# Altium PCB RheoBoard_v2.PcbDoc (part 1 of 5)
Units mm, origin at the board's own origin, x right, y up, seen from the top; angles counter-clockwise.
Board outline 136.04 x 88.34 mm, 2 copper layers (Top Layer, Bottom Layer); 133 components, 71 nets, 341 pads, 184 vias.
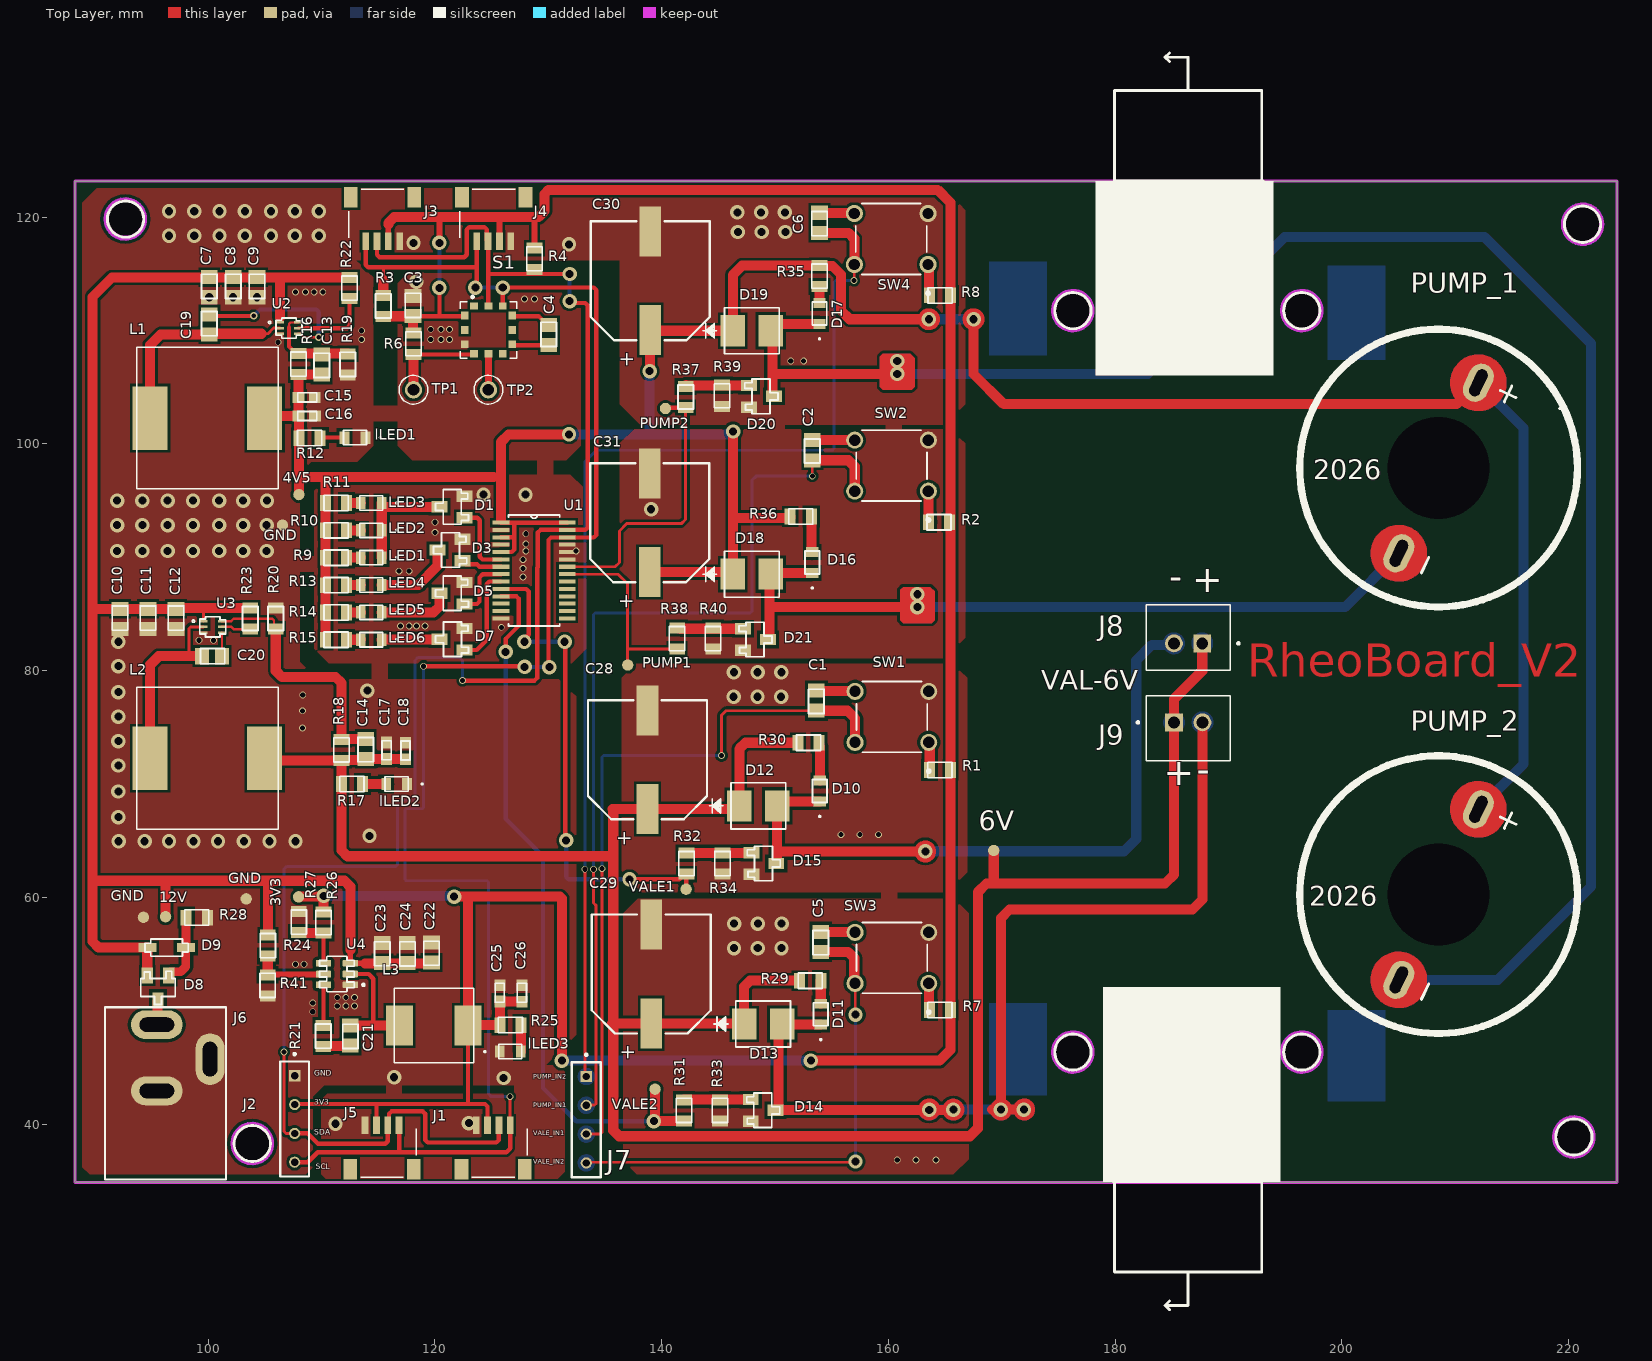
[diagram p0: Top Layer view]
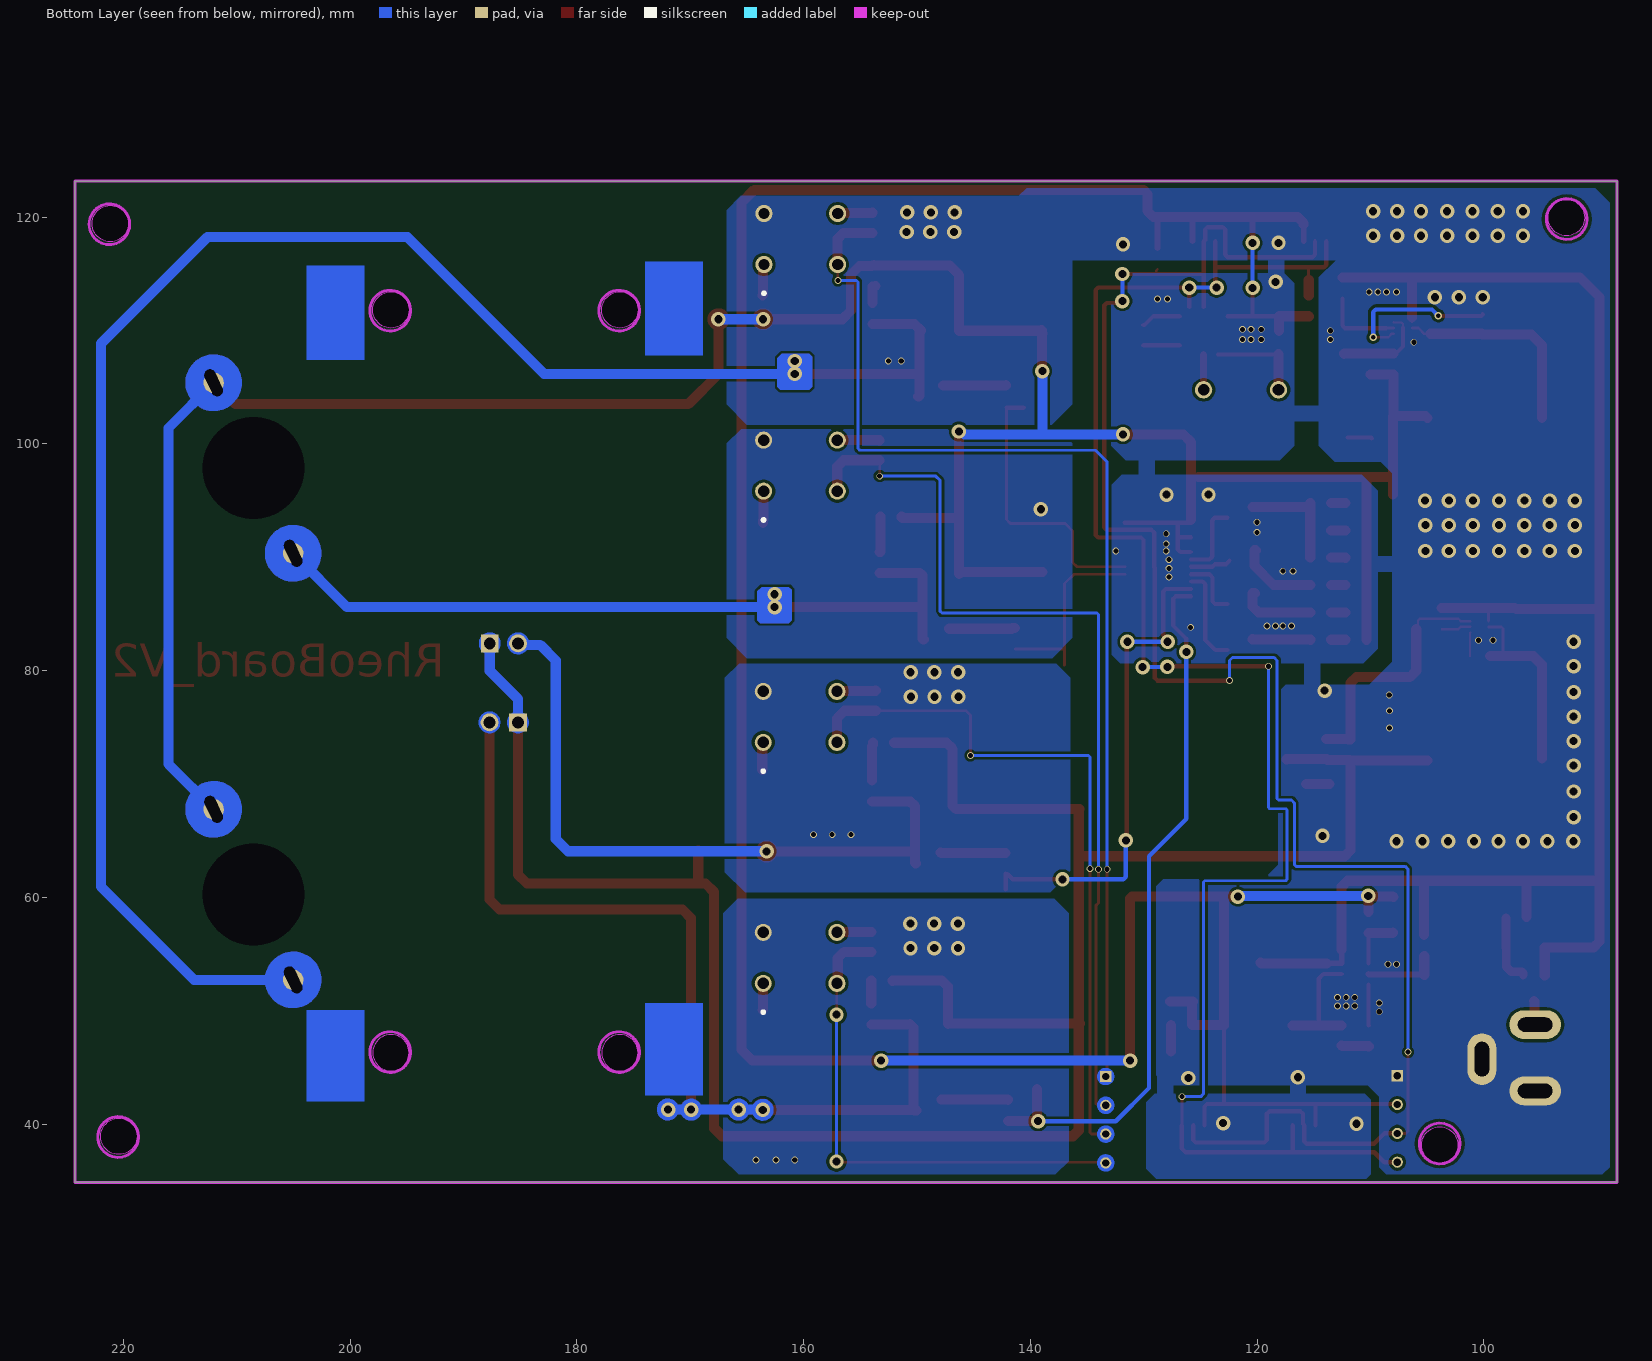
[diagram p1: Bottom Layer view, seen from below]
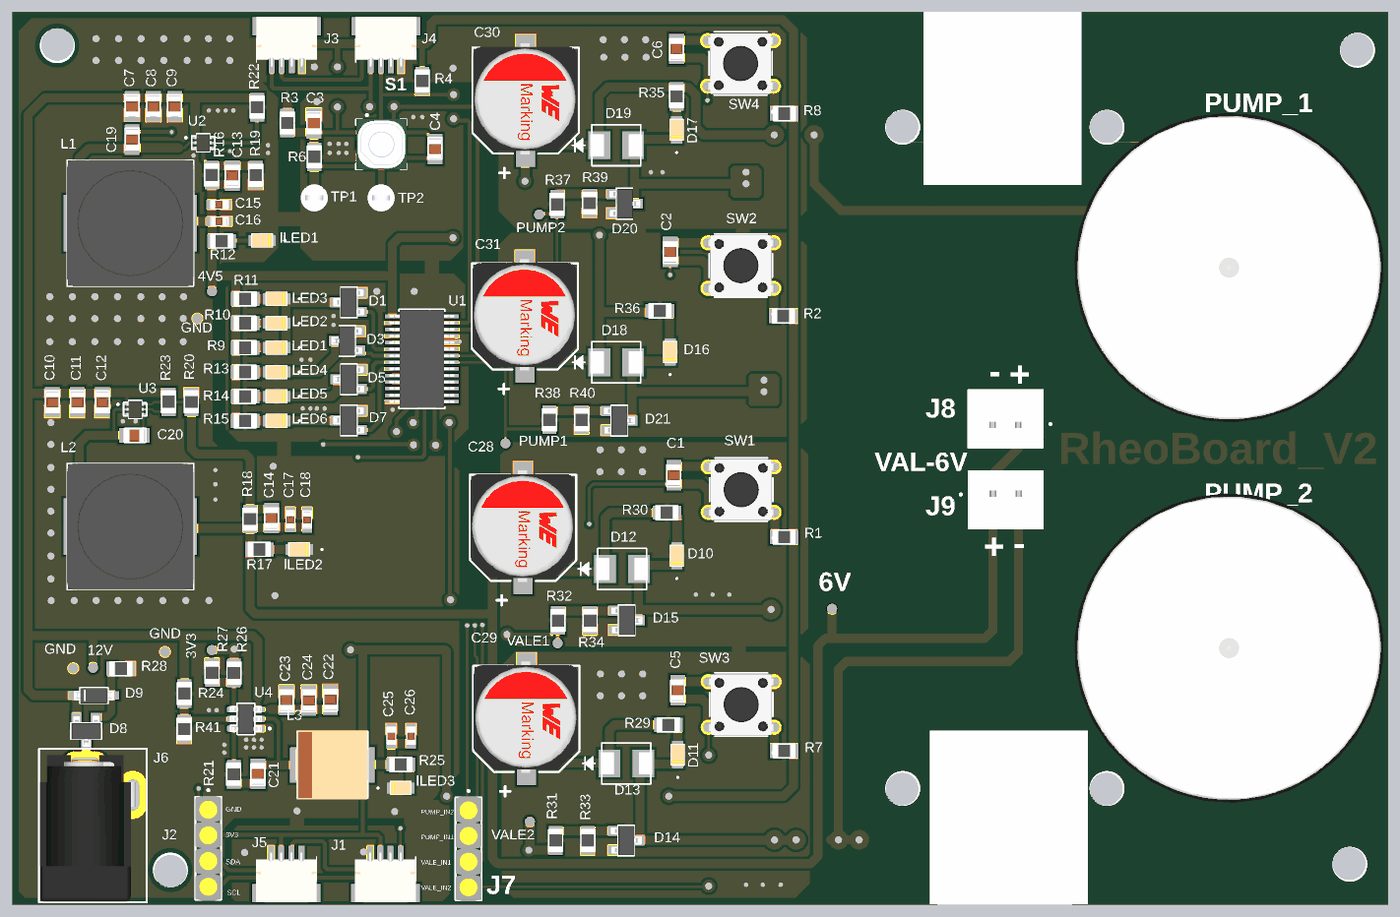
[diagram p3: 3D render of the assembled board from above, using the file's embedded part models]

## Layer stack, top to bottom
Top Solder: solder mask 0.0102, Solder Resist, Dk 3.5
Top Layer: signal copper 0.0356
Dielectric 1: dielectric 0.32, FR-4, Dk 4.8
Bottom Layer: signal copper 0.0356
Bottom Solder: solder mask 0.0102, Solder Resist, Dk 3.5

## Board outline
88.24,34.85 88.24,123.19 106.965,123.19 224.282,123.19 224.282,34.85
cut-out: 218.803,38.92 ccw(c220.403,38.92) 220.403,37.32 ccw(c220.403,38.92) 222.003,38.92 ccw(c220.403,38.92) 220.403,40.52 ccw(c220.403,38.92)
cut-out: 218.803,38.92 ccw(c220.403,38.92) 220.403,37.32 ccw(c220.403,38.92) 222.003,38.92 ccw(c220.403,38.92) 220.403,40.52 ccw(c220.403,38.92)
cut-out: 174.607,46.297 cw(c176.207,46.297) 176.207,47.897 cw(c176.207,46.297) 177.807,46.297 cw(c176.207,46.297) 176.207,44.697 cw(c176.207,46.297)
cut-out: 174.607,46.297 cw(c176.207,46.297) 176.207,47.897 cw(c176.207,46.297) 177.807,46.297 cw(c176.207,46.297) 176.207,44.697 cw(c176.207,46.297)
cut-out: 194.8,46.297 cw(c196.4,46.297) 196.4,47.897 cw(c196.4,46.297) 198,46.297 cw(c196.4,46.297) 196.4,44.697 cw(c196.4,46.297)
cut-out: 194.8,46.297 cw(c196.4,46.297) 196.4,47.897 cw(c196.4,46.297) 198,46.297 cw(c196.4,46.297) 196.4,44.697 cw(c196.4,46.297)
cut-out: 174.607,111.818 ccw(c176.207,111.818) 176.207,110.218 ccw(c176.207,111.818) 177.807,111.818 ccw(c176.207,111.818) 176.207,113.418 ccw(c176.207,111.818)
cut-out: 174.607,111.818 ccw(c176.207,111.818) 176.207,110.218 ccw(c176.207,111.818) 177.807,111.818 ccw(c176.207,111.818) 176.207,113.418 ccw(c176.207,111.818)
cut-out: 194.8,111.818 ccw(c196.4,111.818) 196.4,110.218 ccw(c196.4,111.818) 198,111.818 ccw(c196.4,111.818) 196.4,113.418 ccw(c196.4,111.818)
cut-out: 194.8,111.818 ccw(c196.4,111.818) 196.4,110.218 ccw(c196.4,111.818) 198,111.818 ccw(c196.4,111.818) 196.4,113.418 ccw(c196.4,111.818)
cut-out: 219.565,119.438 ccw(c221.165,119.438) 221.165,117.838 ccw(c221.165,119.438) 222.765,119.438 ccw(c221.165,119.438) 221.165,121.038 ccw(c221.165,119.438)
cut-out: 219.565,119.438 ccw(c221.165,119.438) 221.165,117.838 ccw(c221.165,119.438) 222.765,119.438 ccw(c221.165,119.438) 221.165,121.038 ccw(c221.165,119.438)
cut-out: 91.11,119.957 ccw(c92.71,119.957) 92.71,118.357 ccw(c92.71,119.957) 94.31,119.957 ccw(c92.71,119.957) 92.71,121.557 ccw(c92.71,119.957)
cut-out: 102.286,38.158 ccw(c103.886,38.158) 103.886,36.558 ccw(c103.886,38.158) 105.486,38.158 ccw(c103.886,38.158) 103.886,39.758 ccw(c103.886,38.158)

## Design rules (kind name [scope] priority, off if disabled: settings)
Clearance [All] p1: gap=0.254 ignorepadtopadclearanceinfootprint=FALSE except(0: Arc-Hole Track-Hole SMDPad-Hole THPad-Hole Via-Hole Fill-Hole Poly-Hole Region-Hole Text-Hole)
PolygonConnect [All] p1: connectstyle=Direct reliefconductorwidth=0.254 reliefentries=4 polygonreliefangle="90 Angle" airgapwidth=0.254
RoutingVias [All] p1: holewidth=0.45 width=0.55 viastyle="Through Hole" minholewidth=0.381 minwidth=0.381 maxholewidth=1.27 maxwidth=1.27
SolderMaskExpansion [All] p1: expansion=0.102 istentingtop=FALSE
Width [All] p1: maxlimit=0.889 minlimit=0.203 preferedwidth=0.381 minimp=50.000000 maximp=50.000000 favimp=50.000000
30 further rules are at their usual default settings.

## Classes and differential pairs
component class POWER: 3V3 4V5 6V 12V C7 C8 C9 C10 C11 C12 C13 C14 C15 C16 C17 C18 C19 C20 C21 C22 C23 C24 C25 C26 D8 D9 GND J6 L1 L2 L3 lLED1 lLED2 lLED3 R12 R16 R17 R18 R19 R20 R21 R22 R23 R24 R25 R26 R27 R28 R41 U2 U3 U4
component class MAIN: C1 C2 C3 C4 C5 C6 C28 C29 C30 C31 D1 D3 D5 D7 D10 D11 D12 D13 D14 D15 D16 D17 D18 D19 D20 D21 J1 J2 J3 J4 J5 J7 J8 J9 LED1 LED2 LED3 LED4 LED5 LED6 PUMP1 PUMP2 PUMP_1 PUMP_2 R1 R2 R3 R4 R6 R7 R8 R9 R10 R11 R13 R14 R15 R29 R30 R31 R32 R33 R34 R35 R36 R37 R38 R39 R40 S1 SW1 SW2 SW3 SW4 TP1 TP2 U1 VALE1 VALE2

## Components (designator, comment, footprint, x,y, rotation, side; value= is the part's Value field where it differs from the comment)
3V3 "TP_1MM" TP_1mm 107.975,60.046 r90 top
4V5 "TP_1MM" TP_1mm 108.001,95.529 r90 top
6V "6V" TP_1mm 169.291,64.135 r0 top
12V "TP_1MM" TP_1mm 96.241,58.293 r90 top
C1 "0.1UF,50V" CAP_CER_0805 153.64,77.35 r270 top
C2 "0.1UF,50V" CAP_CER_0805 153.289,99.441 r270 top
C3 "0.1UF,50V" CAP_CER_0805 118.06,112.15 r90 top
C4 "1nF 50V" CAP_CER_0805 130.048,109.601 r90 top
C5 "0.1UF,50V" CAP_CER_0805 154.035,56.07 r270 top
C6 "0.1UF,50V" CAP_CER_0805 153.924,119.507 r270 top
C7 "10UF 50V" CAP_CER_0805 100.09,113.824 r90 top
C8 "10UF 50V" CAP_CER_0805 102.2,113.824 r90 top
C9 "0.1UF,50V" CAP_CER_0805 104.31,113.824 r90 top
C10 "10UF 50V" CAP_CER_0805 92.212,84.564 r90 top
C11 "10UF 50V" CAP_CER_0805 94.688,84.564 r90 top
C12 "0.1UF,50V" CAP_CER_0805 97.165,84.564 r90 top
C13 "18pF 50V" CAP_CER_0805 110.01,106.99 r270 top
C14 "18pF 50V" CAP_CER_0805 113.896,73.1 r270 top
C15 "22uF 6.3V" CAP_CER_0603 108.68,104.11 r180 top
C16 "22uF 6.3V" CAP_CER_0603 108.69,102.46 r180 top
C17 "22uF 6.3V" CAP_CER_0603 115.74,72.93 r270 top
C18 "22uF 6.3V" CAP_CER_0603 117.4,72.91 r270 top
C19 "0.1UF,50V" CAP_CER_0805 100.1,110.54 r90 top
C20 "0.1UF,50V" CAP_CER_0805 100.33,81.28 r0 top
C21 "0.1UF,50V" CAP_CER_0805 112.54,47.8 r270 top
C22 "0.1UF,50V" CAP_CER_0805 119.699,55.136 r270 top
C23 "10UF 25V" CAP_CER_0805 115.36,55.095 r270 top
C24 "10UF 25V" CAP_CER_0805 117.569,55.076 r270 top
C25 "22uF 6.3V" CAP_CER_0603 125.72,51.53 r270 top
C26 "22uF 6.3V" CAP_CER_0603 127.671,51.525 r270 top
C28 "100uF 25V" CAP_ALUM_SMD_D10_H12.4 138.75,72.14 r270 top
C29 "100uF 25V" CAP_ALUM_SMD_D10_H12.4 139.08,53.24 r270 top
C30 "100uF 25V" CAP_ALUM_SMD_D10_H12.4 139,114.395 r270 top
C31 "100uF 25V" CAP_ALUM_SMD_D10_H12.4 138.94,93.04 r270 top
D1 "30V 5.8A" SOT-23-3 121.505,94.445 r90 top
D3 "30V 5.8A" SOT-23-3 121.335,90.635 r90 top
D5 "30V 5.8A" SOT-23-3 121.505,86.825 r90 top
D7 "30V 5.8A" SOT-23-3 121.51,82.77 r90 top
D8 "20V 4A" SOT-23-3 95.57,52.02 r180 top
D9 "BZT52C5V1" SOD-123 96.33,55.56 r0 top
D10 "Led green" "LED_LS R976_AOS" 153.94,69.38 r90 top
D11 "Led green" "LED_LS R976_AOS" 154.03,49.7 r90 top
D12 "3A 40V" DO214AA 148.53,68.07 r0 top
D13 "3A 40V" DO214AA 148.955,48.835 r0 top
D14 "30V 5.8A" SOT-23-3 148.955,41.215 r270 top
D15 "30V 5.8A" SOT-23-3 149.01,62.99 r270 top
D16 "Led green" "LED_LS R976_AOS" 153.289,89.535 r90 top
D17 "Led green" "LED_LS R976_AOS" 153.924,111.506 r90 top
D18 "3A 40V" DO214AA 147.954,88.508 r0 top
D19 "3A 40V" DO214AA 147.954,109.982 r0 top
D20 "30V 5.8A" SOT-23-3 148.798,104.196 r270 top
D21 "30V 5.8A" SOT-23-3 148.273,82.748 r270 top
GND "TP_1MM" TP_1mm 103.353,59.868 r90 top
GND "TP_1MM" TP_1mm 94.285,58.242 r90 top
GND "TP_1MM" TP_1mm 106.553,92.837 r90 top
J1 "14417" SPARKFUN_PRT-14417 125.14,37.453 r0 top
J2 "TS-104-T-A" HDR_THT_1X04_P2.54 107.63,40.45 r270 top
J3 "14417" SPARKFUN_PRT-14417 115.39,120.33 r180 top
J4 "14417" SPARKFUN_PRT-14417 125.19,120.33 r180 top
J5 "14417" SPARKFUN_PRT-14417 115.34,37.453 r0 top
J6 "694106301002" "CONN PWR JACK 2.1X5.5MM SOLDER" 95.72,42.93 r90 top
J7 "TS-104-T-A" HDR_THT_1x04_P2.54 133.35,40.386 r270 top
J8 "VERT" CONN_SMD_TOP_P2.50 186.436,82.931 r0 top
J9 "VERT" CONN_SMD_TOP_P2.50 186.456,74.913 r180 top
L1 "2.2uH" IND_12.5x12.5_H8.5 99.93,102.28 r180 top
L2 "2.2uH" IND_12.5x12.5_H8.5 99.93,72.263 r180 top
L3 "4.7uH" IND_6.8X6.5_H2.8 123.42,52 r180 top
LED1 "RED 2V 20mA" "LED_LS R976_AOS" 114.381,89.965 r180 top
LED2 "RED 2V 20mA" "LED_LS R976_AOS" 114.381,92.378 r180 top
LED3 "RED 2V 20mA" "LED_LS R976_AOS" 114.381,94.791 r180 top
LED4 "Led green" "LED_LS R976_AOS" 114.381,87.552 r180 top
LED5 "Led green" "LED_LS R976_AOS" 114.381,85.139 r180 top
LED6 "Led green" "LED_LS R976_AOS" 114.381,82.726 r180 top
lLED1 "RED 2V 20mA" "LED_LS R976_AOS" 112.95,100.56 r180 top
lLED2 "RED 2V 20mA" "LED_LS R976_AOS" 116.62,70 r180 top
lLED3 "RED 2V 20mA" "LED_LS R976_AOS" 126.65,46.4 r0 top
PUMP1 "TP_1MM" TP_1mm 137.008,80.493 r90 top
PUMP2 "TP_1MM" TP_1mm 140.335,103.124 r90 top
PUMP_1 "0010844022" "PUMP_LPM - ZR370-02PM"#1 208.534,97.872 r245 top
PUMP_2 "0010844022" "PUMP_LPM - ZR370-02PM"#2 208.534,60.243 r245 top
R1 "10K 1% 0805" RES_0805 164.55,71.23 r0 top
R2 "10K 1% 0805" RES_0805 164.465,93.091 r0 top
R3 "10K 1% 0805" RES_0805 115.443,112.182 r90 top
R4 "10K 1% 0805" RES_0805 128.778,116.332 r270 top
R6 "10K 1% 0805" RES_0805 118.11,108.839 r90 top
R7 "10K 1% 0805" RES_0805 164.55,50.07 r0 top
R8 "10K 1% 0805" RES_0805 164.564,113.106 r0 top
R9 "220R 0805" RES_0805 111.279,89.959 r180 top
R10 "220R 0805" RES_0805 111.279,92.372 r180 top
R11 "220R 0805" RES_0805 111.279,94.785 r180 top
R12 "1K 1% 0805" RES_0805 108.95,100.51 r180 top
R13 "220R 0805" RES_0805 111.279,87.546 r0 top
R14 "220R 0805" RES_0805 111.279,85.133 r0 top
R15 "220R 0805" RES_0805 111.279,82.72 r0 top
R16 "130K 0805" RES_0805 107.96,107.04 r270 top
R17 "1K 1% 0805" RES_0805 112.68,70 r180 top
R18 "270K 0805" RES_0805 111.754,73.01 r270 top
R19 "20K 0805" RES_0805 112.32,107.02 r270 top
R20 "30K 0805" RES_0805 105.96,84.6 r270 top
R21 "30Ohm 0805" RES_0805 110.15,47.76 r270 top
R22 "100K 0805" RES_0805 112.46,113.74 r90 top
R23 "100K 0805" RES_0805 103.71,84.6 r90 top
R24 "174K 0805" RES_0805 105.26,55.75 r90 top
R25 "470R 0805" RES_0805 126.655,48.731 r180 top
R26 "75K 0805" RES_0805 110.169,57.779 r90 top
R27 "24K 0805" RES_0805 108,57.81 r270 top
R28 "100K 0805" RES_0805 98.99,58.21 r180 top
R29 "220R 0805" RES_0805 153.105,52.645 r0 top
R30 "220R 0805" RES_0805 152.96,73.64 r0 top
R31 "100R 0805" RES_0805 141.97,41.215 r90 top
R32 "100R 0805" RES_0805 142.195,62.97 r90 top
R33 "10K 1% 0805" RES_0805 145.145,41.215 r90 top
R34 "10K 1% 0805" RES_0805 145.37,62.97 r90 top
R35 "220R 0805" RES_0805 153.924,114.808 r270 top
R36 "220R 0805" RES_0805 152.273,93.599 r0 top
R37 "100R 0805" RES_0805 142.113,104.14 r90 top
R38 "100R 0805" RES_0805 141.361,82.831 r90 top
R39 "10K 1% 0805" RES_0805 145.322,104.25 r90 top
R40 "10K 1% 0805" RES_0805 144.536,82.831 r90 top
R41 "36.5K 0805" RES_0805 105.239,52.233 r90 top
S1 "MPRLS0025PA00001A" XDCR_MPRLS0025PA00001A 124.714,110.061 r0 top
SW1 "B3F-1020" SW_B3F-1000_OMR 163.56,73.67 r180 top
SW2 "B3F-1020" SW_B3F-1000_OMR 163.531,95.832 r180 top
SW3 "B3F-1020" SW_B3F-1000_OMR 163.56,52.415 r180 top
SW4 "B3F-1020" SW_B3F-1000_OMR 163.498,115.826 r180 top
TP1 "5002" KEYSTONE_5002 118.11,104.775 r0 top
TP2 "5002" KEYSTONE_5002 124.714,104.775 r0 top
U1 "PCA9685PW,118" TSSOP-28 128.745,88.835 r0 top
U2 "TPS563203DRLR" SOT-563 107.13,110.22 r0 top
U3 "TPS563203DRLR" SOT-563 100.4,83.86 r0 top
U4 "TPS56339DDCT" SOT-23-6 111.35,53.235 r180 top
VALE1 "TP_1MM" TP_1mm 142.164,60.719 r90 top
VALE2 "TP_1MM" TP_1mm 139.421,43.078 r90 top

## Footprints (in the part's own frame and the unit in brackets; to place one, negate y for a bottom-side part, rotate by r counter-clockwise, add the part's x,y. Pads: shape width x height; smd on the part's side, far side on the other; paste and mask are expansions set on the pad)
CAP_ALUM_SMD_D10_H12.4 [mm]
  rect 4.4x1.9 smd: 1(4.35,0) 2(-4.35,0)
  silkscreen extent -5.25,-5.25 5.25,5.25, body extent -5.67,-5.21 5.33,5.09, height 12.25
CAP_CER_0603 [mm]
  rect 1.04x0.97 smd paste+0 mask+0.102: 1(-0.726,0) 2(0.726,0)
  silkscreen extent -0.89,-0.4 0.79,0.4, body extent -0.8,-0.4 0.8,0.4, height 0.95
CAP_CER_0805 [mm]
  rect 1.24x1.47 smd: 1(-0.885,0) 2(0.885,0)
  silkscreen extent -1,-0.68 1.13,0.68, body extent -1,-0.62 1,0.63, height 1.45
"CONN PWR JACK 2.1X5.5MM SOLDER" [mil]
  oval 100x180 hole 50 slot 120 at 90 deg: 1(230,10) 2(0,10)
  oval 180x100 hole 50 slot 120 at 0 deg: 3(110,-175)
  silkscreen extent -308,-230 290,190, body extent -306,-187 265,187, height 421
CONN_SMD_TOP_P2.50 [mm]
  rect 1.575x1.575 / inner round 1.575 / far side rect 1.575x1.575 hole 1.05: 1(1.25,-0.525)
  round 1.575 hole 1.05: 2(-1.25,-0.525)
  silkscreen extent -3.7,-2.88 4.54,2.88, body extent -3.75,-2.79 3.75,2.91, height 2.11
DO214AA [mil]
  rect 85x108 smd paste+0 mask+0: 1(-66,0) 2(66,0)
  silkscreen extent -170,-80 95,80, body extent -108,-78 108,78, height 96
HDR_THT_1X04_P2.54 [mm]
  rect 0.985x0.985 hole 0.635: 01(-3.81,0)
  round 0.985 hole 0.635: 02(-1.27,0) 03(1.27,0) 04(3.81,0)
  silkscreen extent -5.83,-1.27 5.08,1.27, body extent -5.18,-1.27 5.18,1.27, height 8.28
HDR_THT_1x04_P2.54 [mm]
  rect 0.985x0.985 hole 0.635: 01(-3.81,0)
  round 0.985 hole 0.635: 02(-1.27,0) 03(1.27,0) 04(3.81,0)
  silkscreen extent -5.83,-1.27 5.08,1.27, body extent -5.18,-1.27 5.18,1.27, height 8.28
IND_6.8X6.5_H2.8 [mm]
  rect 2.35x3.5 smd: 1(6.55,3.3) 2(0.5,3.3)
  silkscreen extent 0,0 7,6.6, body extent -0.09,-0.1 7.2,6.71, height 3.05
IND_12.5x12.5_H8.5 [mm]
  rect 3.1x5.6 smd: 1(-5.05,0) 2(5.05,0)
  silkscreen extent -6.25,-6.25 6.25,6.25, body extent -6.25,-6.25 6.25,6.25, height 6.5
KEYSTONE_5002 [mm]
  round 1.53 hole 1.02: TP(0,0)
  silkscreen extent -1.27,-1.27 1.27,1.27, body extent -1.27,-1.27 1.27,1.27, height 4.57
"LED_LS R976_AOS" [mil]
  rect 33.78x43 smd paste+0 mask+0: 1(-36.39,0) 2(36.39,0)
  silkscreen extent -91,-25 40,25, body extent -39,-26 39,26, height 32
"PUMP_LPM - ZR370-02PM"#1 [mm]
  oval 3.5x2.2 / inner round 1.524 / far side round 1.808 hole 1 slot 2.5 at 0 deg paste-2539.97 mask+0: 1(-8.3,0) 2(8.3,0)
  round 1.524 hole 9 unplated: S(0,0)
  silkscreen extent -12.25,-12.25 12.25,12.25, body extent -15.31,-15.31 15.31,15.31, height 65
"PUMP_LPM - ZR370-02PM"#2 [mm]
  oval 3.5x2.2 / inner round 1.524 / far side round 1.808 hole 1 slot 2.5 at 0 deg paste-2539.97 mask+0: 1(-8.3,0) 2(8.3,0)
  round 1.524 hole 9 unplated: 3(0,0)
  silkscreen extent -12.25,-12.25 12.25,12.25, body extent -15.31,-15.31 15.31,15.31, height 65
RES_0805 [mm]
  rect 0.97x1.38 smd: 1(-0.93,0) 2(0.93,0)
  silkscreen extent -1.07,-0.69 1.07,0.68, body extent -1,-0.62 1,0.63, height 0.6
SOD-123 [mm]
  rect 1.6x0.8 smd: 1(-1.7,0) 2(1.7,0)
  silkscreen extent -1.91,-0.76 1.91,0.76, body extent -1.82,-0.77 1.83,0.78, height 1.44
SOT-23-3 [mm]
  rect 1x1.4 smd paste+0 mask+0.102: 1(-0.95,-1.1) 2(0.95,-1.1) 3(0,1.1)
  silkscreen extent -1.52,-1.46 1.52,1.46, body extent -1.45,-1.4 1.45,1.4, height 1.25
SOT-23-6 [mm]
  rrect25% 1.35x0.6 smd: 1(-1.185,0.95) 2(-1.185,0) 3(-1.185,-0.95) 4(1.185,-0.95) 5(1.185,0) 6(1.185,0.95)
  silkscreen extent -2.45,-1.55 1.52,1.55, body extent -1.4,-1.5 1.4,1.5, height 1.16
SOT-563 [mil]
  rect 28x9 smd paste+0 mask+0: 1(-31.5,19.69) 2(-31.5,0) 3(-31.5,-19.69) 4(31.5,-19.69) 5(31.5,0) 6(31.5,19.69)
  silkscreen extent -71,-35 45,35, body extent -34,-34 34,34, height 24
SPARKFUN_PRT-14417 [mm]
  rect 0.6x1.55 smd: 1(-1.5,2.45) 2(-0.5,2.45) 3(0.5,2.45) 4(1.5,2.45)
  rect 1.2x1.8 smd: S1(-2.8,-1.425) S2(2.8,-1.425)
  silkscreen extent -1.88,-2.12 3,2.12, body extent -3,-2.37 3,2.58, height 2.95
SW_B3F-1000_OMR [mm]
  round 1.508 / inner round 1.524 / far side round 1.508 hole 1 paste-2539.97 mask+0: 1(0,0) 2(6.5,0) 3(0,-4.5) 4(6.5,-4.5)
  silkscreen extent -0.13,-5.38 6.38,2.67, body extent -0.7,-5.24 7.2,0.76, height 5
TP_1mm [mm]
  round 1 smd: 1(0,0)
TSSOP-28 [mil]
  rect 58x14 smd: 1(-115,166) 2(-115,141) 3(-115,115) 4(-115,90) 5(-115,64) 6(-115,38) 7(-115,13) 8(-115,-13) 9(-115,-38) 10(-115,-64) 11(-115,-90) 12(-115,-115) 13(-115,-141) 14(-115,-166) 15(115,-166) 16(115,-141) 17(115,-115) 18(115,-90) 19(115,-64) 20(115,-38) 21(115,-13) 22(115,13) 23(115,38) 24(115,64) 25(115,90) 26(115,115) 27(115,141) 28(115,166)
  silkscreen extent -89,-193 89,193, body extent -126,-191 126,191, height 43
XDCR_MPRLS0025PA00001A [mm]
  rect 0.7x0.65 smd: 1(-1.27,2.1) 2(0,2.1) 3(1.27,2.1) 7(1.27,-2.1) 8(0,-2.1) 9(-1.27,-2.1)
  rect 0.65x0.7 smd: 4(2.1,1.27) 5(2.1,0) 6(2.1,-1.27) 10(-2.1,-1.27) 11(-2.1,0) 12(-2.1,1.27)
  silkscreen extent -2.5,-2.5 2.5,3, body extent -2.46,-2.5 2.54,2.5, height 5.9

## Part data
6V: library part TP_1MM
C1 C2 C3 C5 C6 C9 C12 C19 C20 C21 C22: library part "CAP_CER, 0805, X7R, 0.1UF, 5%, 50V", "Ceramic Capacitor, Multilayer, Ceramic, 50V, 10% +Tol, 10% -Tol, X7R, 15% TC, 0.1uF, Surface Mount, 0805", Capacitance=100nF, Dielectric Material=Ceramic, Manufacturer=Nextgen, Manufacturer Part Number=0805B104K500BD, Max Operating Temperature=125°C, Min Operating Temperature=-55°C, Supplier Part Number 1=3372-0805B104K500BDTR-ND, Voltage Rating (DC)=50V, Category="Ceramic Capacitors", ComponentLink1Description="New link", Export Control Classification Number (ECCN) Code=EAR99, Harmonized Tariff Schedule (HTS) Code=8532.24.00.20, Height=850µm, Length=2mm, LIB MADE BY="MR HOANG", Link=https://linhkien.cxtvn.com/1976-tu-khong-phan-cuc-0805.html, Mount="Surface Mount", Number of Terminals=2, Pricing 1="8000=0.0788 (USD)", REACH SVHC=Yes, RoHS=Compliant, Stock 1=24000, Supplier 1="DigiKey Marketplace", Width=1.25mm
C4: library part "CAP_CER 0805 1NF 50V ULTRA STABL", "Cap Ceramic 0.001uF 50V X8R 10% Pad SMD 0805 150C T/R Automotive AEC-Q200", Capacitance=1nF, Case/Package=0805, Dielectric=X8R, Dielectric Material=Ceramic, Manufacturer="Yageo Group", Manufacturer Part Number=C0805C102K5HACAUTO, Max Operating Temperature=150°C, Min Operating Temperature=-55°C, Ratings=AEC-Q200, Supplier Part Number 1=399-C0805C102K5HACAUTODKR-ND, Temperature Coefficient=30ppm/°C, Voltage Rating=50V, Category="Ceramic Capacitors", China RoHS=Compliant, ComponentLink1Description=https://datasheet.octopart.com:443/C0805C102K5HACAUTO-KEMET-datasheet-178087918.pdf?src-supplier=IHS, ComponentLink1URL=https://datasheet.octopart.com:443/C0805C102K5HACAUTO-KEMET-datasheet-178087918.pdf?src-supplier=IHS, ComponentLink2Description=https://datasheet.octopart.com:443/C0805C102K5HACAUTO-KEMET-datasheet-68331921.pdf?src-supplier=Upverter, ComponentLink2URL=https://datasheet.octopart.com:443/C0805C102K5HACAUTO-KEMET-datasheet-68331921.pdf?src-supplier=Upverter, ComponentLink3Description=https://datasheet.octopart.com:443/C0805C102K5HACAUTO-KEMET-datasheet-181957571.pdf?src-supplier=Newark, ComponentLink3URL=https://datasheet.octopart.com:443/C0805C102K5HACAUTO-KEMET-datasheet-181957571.pdf?src-supplier=Newark, ComponentLink4Description=https://datasheet.octopart.com:443/C0805C102K5HACAUTO-KEMET-datasheet-181957570.pdf?src-supplier=Newark, ComponentLink4URL=https://datasheet.octopart.com:443/C0805C102K5HACAUTO-KEMET-datasheet-181957570.pdf?src-supplier=Newark, ComponentLink5Description=https://datasheet.octopart.com:443/C0805C102K5HACAUTO-KEMET-datasheet-149523697.pdf?src-supplier=Farnell, ComponentLink5URL=https://datasheet.octopart.com:443/C0805C102K5HACAUTO-KEMET-datasheet-149523697.pdf?src-supplier=Farnell, ComponentLink6Description=https://datasheet.octopart.com:443/C0805C102K5HACAUTO-KEMET-datasheet-138896532.pdf?src-supplier=Farnell, ComponentLink6URL=https://datasheet.octopart.com:443/C0805C102K5HACAUTO-KEMET-datasheet-138896532.pdf?src-supplier=Farnell, ComponentLink7Description=https://datasheet.octopart.com/C0805C102K5HACAUTO-KEMET-datasheet-84169754.pdf, ComponentLink7URL=https://datasheet.octopart.com/C0805C102K5HACAUTO-KEMET-datasheet-84169754.pdf, Country of Origin=Mexico, Export Control Classification Number (ECCN) Code=EAR99, Harmonized Tariff Schedule (HTS) Code=8532.24.00.20, Height=780µm, Introduction Date=2017-10-02, Lead Free="Lead Free", Length=2mm, LIB MADE BY="MR HOANG", Lifecycle Status=Production, Link=https://linhkien.cxtvn.com/3023-tu-102-1nf-0805-50v-10-20c.html, Material=Ceramic, Mount="Surface Mount", Number of Terminals=2, Pricing 1="1=0.18, 10=0.1, 50=0.07, 100=0.0608, 500=0.0454 (USD)", REACH SVHC=Yes, RoHS=Compliant, Stock 1=54307, Supplier 1=DigiKey, Voltage Rating (DC)=50V, Width=1.25mm
C7 C8 C10 C11: library part "CAP_CER, 0805, X5R, 10UF, 10%, 50V", "CAP_CER,0805,X5R,10UF,10%,50V", Manufacturer=Nextgen, Manufacturer Part Number=0805W106K500CC, Supplier Part Number 1=3372-0805W106K500CCTR-ND, Category="Ceramic Capacitors", LIB MADE BY="MR HOANG", Link=https://linhkien.cxtvn.com/1978-tu-106-10uf-0805-50v-10-10c.html, Pricing 1="3000=1.1378 (USD)", Stock 1=8000000, Supplier 1="DigiKey Marketplace"
C13 C14: library part "CAP_CER, 18PF 50V X8R 0805", "Multilayer Ceramic Capacitors MLCC - SMD/SMT 50V 18pF X8R 0805 5%", Capacitance=18pF, Case/Package=0805, Dielectric=X8R, Dielectric Material=Ceramic, Manufacturer="Yageo Group", Manufacturer Part Number=C0805C180J5HACTU, Max Operating Temperature=150°C, Min Operating Temperature=-55°C, Supplier Part Number 1=399-C0805C180J5HACTUCT-ND, Temperature Coefficient=30ppm/°C, Voltage Rating=50V, Category="Ceramic Capacitors", China RoHS=Compliant, ComponentLink1Description=https://datasheet.octopart.com:443/C0805C180J5HACTU-KEMET-datasheet-178087918.pdf?src-supplier=IHS, ComponentLink1URL=https://datasheet.octopart.com:443/C0805C180J5HACTU-KEMET-datasheet-178087918.pdf?src-supplier=IHS, ComponentLink2Description=https://datasheet.octopart.com:443/C0805C180J5HACTU-KEMET-datasheet-68331921.pdf?src-supplier=Upverter, ComponentLink2URL=https://datasheet.octopart.com:443/C0805C180J5HACTU-KEMET-datasheet-68331921.pdf?src-supplier=Upverter, ComponentLink3Description=https://datasheet.octopart.com:443/C0805C180J5HACTU-KEMET-datasheet-189885856.pdf?src-supplier=element14+APAC, ComponentLink3URL=https://datasheet.octopart.com:443/C0805C180J5HACTU-KEMET-datasheet-189885856.pdf?src-supplier=element14+APAC, ComponentLink4Description=https://datasheet.octopart.com/C0805C180J5HACTU-KEMET-datasheet-84169754.pdf, ComponentLink4URL=https://datasheet.octopart.com/C0805C180J5HACTU-KEMET-datasheet-84169754.pdf, Country of Origin=Mexico, Export Control Classification Number (ECCN) Code=EAR99, Harmonized Tariff Schedule (HTS) Code=8532.24.00.20, Height=780µm, Introduction Date=2017-10-02, Lead Free="Lead Free", Length=2mm, LIB MADE BY="MR HOANG", Lifecycle Status=Production, Link=https://linhkien.cxtvn.com/2648-tu-180-18pf-0805-50v-5-20c.html, Material=Ceramic, Mount="Surface Mount", Number of Terminals=2, Pricing 1="1=0.1, 10=0.054, 50=0.0372, 100=0.0321, 500=0.02342, 1000=0.02077 (USD)", REACH SVHC=Yes, RoHS=Compliant, Stock 1=17375, Supplier 1=DigiKey, Voltage Rating (DC)=50V, Width=1.25mm
C15 C16 C17 C18 C25 C26: library part "CAP_CER 22UF 6.3V X6S 0603", "6.3V 22uF X6S ±20% 0603 Multilayer Ceramic Capacitors MLCC - SMD/SMT ROHS", Capacitance=22µF, Case Code (Imperial)=0603, Case Code (Metric)=1608, Dielectric=X6S, Dielectric Material=Ceramic, Manufacturer=Murata, Manufacturer Lifecycle Status="IN PRODUCTION", Manufacturer Part Number=GRM188C80J226ME15D, Max Operating Temperature=105°C, Min Operating Temperature=-55°C, Supplier Part Number 1=490-10471-1-ND, Tolerance=20%, Voltage Rating=6.3V, Case/Package=0603, Category="Ceramic Capacitors", ComponentLink1Description=https://datasheet.octopart.com:443/GRM188C80J226ME15D-Murata-datasheet-149523170.pdf?src-supplier=Newark, ComponentLink1URL=https://datasheet.octopart.com:443/GRM188C80J226ME15D-Murata-datasheet-149523170.pdf?src-supplier=Newark, ComponentLink2Description=https://datasheet.octopart.com:443/GRM188C80J226ME15D-Murata-datasheet-141274635.pdf?src-supplier=Geoflip, ComponentLink2URL=https://datasheet.octopart.com:443/GRM188C80J226ME15D-Murata-datasheet-141274635.pdf?src-supplier=Geoflip, ComponentLink3Description=https://datasheet.octopart.com:443/GRM188C80J226ME15D-Murata-datasheet-165579666.pdf?src-supplier=TME, ComponentLink3URL=https://datasheet.octopart.com:443/GRM188C80J226ME15D-Murata-datasheet-165579666.pdf?src-supplier=TME, ComponentLink4Description=https://datasheet.octopart.com:443/GRM188C80J226ME15D-Murata-datasheet-140703315.pdf?src-supplier=Ciiva, ComponentLink4URL=https://datasheet.octopart.com:443/GRM188C80J226ME15D-Murata-datasheet-140703315.pdf?src-supplier=Ciiva, ComponentLink5Description=https://datasheet.octopart.com:443/GRM188C80J226ME15D-Murata-datasheet-138742657.pdf?src-supplier=Ciiva, ComponentLink5URL=https://datasheet.octopart.com:443/GRM188C80J226ME15D-Murata-datasheet-138742657.pdf?src-supplier=Ciiva, ComponentLink6Description=https://datasheet.octopart.com:443/GRM188C80J226ME15D-Murata-datasheet-22122223.pdf?src-supplier=Future+Electronics, ComponentLink6URL=https://datasheet.octopart.com:443/GRM188C80J226ME15D-Murata-datasheet-22122223.pdf?src-supplier=Future+Electronics, ComponentLink7Description=https://datasheet.octopart.com/GRM188C80J226ME15D-Murata-datasheet-12515295.pdf, ComponentLink7URL=https://datasheet.octopart.com/GRM188C80J226ME15D-Murata-datasheet-12515295.pdf, ComponentLink8Description=https://datasheet.octopart.com/GRM188C80J226ME15D-Murata-datasheet-12510076.pdf, ComponentLink8URL=https://datasheet.octopart.com/GRM188C80J226ME15D-Murata-datasheet-12510076.pdf, ComponentLink9Description=https://datasheet.octopart.com/GRM188C80J226ME15D-Murata-datasheet-11978611.pdf, ComponentLink9URL=https://datasheet.octopart.com/GRM188C80J226ME15D-Murata-datasheet-11978611.pdf, ComponentLink10Description=https://datasheet.octopart.com/GRM188C80J226ME15D-Murata-datasheet-10025737.pdf, ComponentLink10URL=https://datasheet.octopart.com/GRM188C80J226ME15D-Murata-datasheet-10025737.pdf, ComponentLink11Description=https://datasheet.octopart.com/GRM188C80J226ME15D-Murata-datasheet-8819587.pdf, ComponentLink11URL=https://datasheet.octopart.com/GRM188C80J226ME15D-Murata-datasheet-8819587.pdf, ComponentLink12Description=https://datasheet.octopart.com:443/GRM188C80J226ME15D-Murata-datasheet-150839322.pdf?src-supplier=Arrow.cn, ComponentLink12URL=https://datasheet.octopart.com:443/GRM188C80J226ME15D-Murata-datasheet-150839322.pdf?src-supplier=Arrow.cn, ComponentLink13Description=http://sigma.octopart.com:80/reach_statement/Murata-company-16.pdf?src-supplier=Compliance+Statements, ComponentLink13URL=http://sigma.octopart.com:80/reach_statement/Murata-company-16.pdf?src-supplier=Compliance+Statements, Country of Origin="Japan, Mainland China, Philippines, Singapore, Thailand", Export Control Classification Number (ECCN) Code=EAR99, Harmonized Tariff Schedule (HTS) Code=8532.24.00.20, Height=800µm, Introduction Date=2013-11-20, Lead Free="Lead Free", Length=1.6mm, LIB MADE BY="MR HOANG", Lifecycle Status=Production, Link=https://linhkien.cxtvn.com/3837-tu-226-22uf-0603-63v-20c.html, Material=Ceramic, Mount="Surface Mount", Number of Terminals=2, Packaging="Tape & Reel (TR)", Pricing 1="1=0.18, 10=0.104, 50=0.0732, 100=0.0639, 500=0.04836, 1000=0.04357 (USD)", REACH SVHC=Yes, RoHS=Compliant, Schedule B="8532240020, 8532240020|8532240020|8532240020|8532240020|8532240020|8532240020|8532240020|8532240020|8532240020|8532240020|8532240020|8532240020|8532240020|8532240020|8532240020|8532240020|8532240020|8532240020|8532240020|8532240020|8532240020|8532240020|8532240020|85", Stock 1=368335, Supplier 1=DigiKey, Termination=SMD/SMT, Thickness=800µm, Voltage Rating (DC)=6.3V, Weight=6.293594mg, Width=800µm
C23 C24: library part "CAP_CER, 0805, X5R, 10UF, 10%, 25V", "Cap SMD, 0805, X5R, 10UF, 10%, 25V", Manufacturer=Nextgen, Manufacturer Part Number=0805W106K250CC, Supplier Part Number 1=3372-0805W106K250CCTR-ND, Category="Ceramic Capacitors", LIB MADE BY="MR HOANG", Link=https://linhkien.cxtvn.com/5144-tu-10uf-0805-25v-10-10c.html, Pricing 1="6000=0.1738 (USD)", Stock 1=18000, Supplier 1="DigiKey Marketplace"
C28 C29 C30 C31: library part "CAP ALUM POLY 100UF 20% 25V SMD", "WCAP-PSLC Aluminum Polymer Capacitors", Capacitance=100µF, Case/Package=Radial, ESR (Equivalent Series Resistance)=15mΩ, Leakage Current=500µA, Manufacturer="Wurth Elektronik", Manufacturer Lifecycle Status=ACTIVE, Manufacturer Part Number=875075561005, Max Operating Temperature=105°C, Min Operating Temperature=-55°C, Ripple Current=4.8A, Supplier Part Number 1=732-6499-6-ND, Tolerance=20%, Voltage Rating=25V, Category="Polymer Capacitors", ComponentLink1Description=https://datasheet.octopart.com:443/875075561005-Wurth-Elektronik-datasheet-168509076.pdf?src-supplier=Wurth+Elektronik, ComponentLink1URL=https://datasheet.octopart.com:443/875075561005-Wurth-Elektronik-datasheet-168509076.pdf?src-supplier=Wurth+Elektronik, ComponentLink2Description=https://datasheet.octopart.com:443/875075561005-W%C3%BCrth-Elektronik-datasheet-37144729.pdf?src-supplier=Newark, ComponentLink2URL=https://datasheet.octopart.com:443/875075561005-W%C3%BCrth-Elektronik-datasheet-37144729.pdf?src-supplier=Newark, Diameter=10mm, Height - Seated (Max)=12.3952mm, Length=12.4mm, LIB MADE BY="MR HOANG", Life (Hours)=2000hours, Lifecycle Status=Production, Link=https://linhkien.cxtvn.com/7789-edk107m025a9laa-cap-alum-100uf-20-25v-smd-8383mm.html, Mount="Surface Mount", Packaging="Tape & Reel (TR)", Pitch=10.3mm, Polarity=Polar, Pricing 1="1=1.6, 50=1.363, 100=1.187 (USD)", REACH SVHC=Unknown, RoHS=Compliant, Stock 1=825, Supplier 1=DigiKey, Voltage Rating (DC)=25V, Width=10.3mm, YEOL="1 = Estimated lifetime > 10 years"
D1 D3 D5 D7 D14 D15 D20 D21: library part "MOSFET N-CH 30V 5.8A SOT23-3", "Trans MOSFET N-CH 30V 5.7A 3-Pin SOT-23", Case/Package=SOT-23, Continuous Drain Current (ID)=5.7A, Drain to Source Breakdown Voltage=30V, Drain to Source Resistance=26.5mΩ, Gate to Source Voltage (Vgs)=12V, Input Capacitance=630pF, Manufacturer="Alpha & Omega Semiconductor", Manufacturer Part Number=AO3400A, Max Junction Temperature (Tj)=150°C, Max Power Dissipation=1.4W, Min Operating Temperature=-55°C, Supplier Part Number 1=785-1000-2-ND, Threshold Voltage=650mV, Category=MOSFETs, ComponentLink1Description=https://sigma.octopart.com:443/140150677/technical_drawing/Alpha-%26-Omega-Semiconductor-AO3400A.pdf?src-supplier=Alpha+%26+Omega+Semiconductor+SCT, ComponentLink1URL=https://sigma.octopart.com:443/140150677/technical_drawing/Alpha-%26-Omega-Semiconductor-AO3400A.pdf?src-supplier=Alpha+%26+Omega+Semiconductor+SCT, ComponentLink2Description=https://datasheet.octopart.com:443/AO3400A-Alpha-%26-Omega-Semiconductor-datasheet-11777925.pdf?src-supplier=IHS, ComponentLink2URL=https://datasheet.octopart.com:443/AO3400A-Alpha-%26-Omega-Semiconductor-datasheet-11777925.pdf?src-supplier=IHS, ComponentLink3Description=https://sigma.octopart.com:443/138895710/technical_drawing/Alpha-%26-Omega-Semiconductor-AO3400A.pdf?src-supplier=Upverter, ComponentLink3URL=https://sigma.octopart.com:443/138895710/technical_drawing/Alpha-%26-Omega-Semiconductor-AO3400A.pdf?src-supplier=Upverter, ComponentLink4Description=https://datasheet.octopart.com:443/AO3400A-Alpha-%26-Omega-Semiconductor-datasheet-14060799.pdf?src-supplier=iiiC, ComponentLink4URL=https://datasheet.octopart.com:443/AO3400A-Alpha-%26-Omega-Semiconductor-datasheet-14060799.pdf?src-supplier=iiiC, ComponentLink5Description=https://datasheet.octopart.com:443/AO3400A-Alpha-%26-Omega-Semiconductor-datasheet-5402508.pdf?src-supplier=Verical, ComponentLink5URL=https://datasheet.octopart.com:443/AO3400A-Alpha-%26-Omega-Semiconductor-datasheet-5402508.pdf?src-supplier=Verical, Country of Origin="Mainland China", Drain to Source Voltage (Vdss)=30V, Export Control Classification Number (ECCN) Code=EAR99, Height=1.25mm, Introduction Date=2007-04-17, Lead Free="Lead Free", LIB MADE BY="MR HOANG", Lifecycle Status=Production, Link=https://linhkien.cxtvn.com/2689-ao3400-mosfet-n-ch-30v-58a-sot23-3-2c.html, Max Operating Temperature=150°C, Min Breakdown Voltage=30V, Mount="Surface Mount", Number of Channels=1, Number of Elements=1, Number of Pins=3, Number of Terminals=3, Power Dissipation=1.4W, Pricing 1="3000=0.11563, 6000=0.10504, 9000=0.09963, 15000=0.09356, 21000=0.08996, 30000=0.08647 (USD)", Radiation Hardening=No, Rds On Max=26.5mΩ, REACH SVHC=Yes, RoHS=Compliant, Schedule B="8541290080, 8541290080|8541290080|8541290080|8541290080|8541290080", Stock 1=170121, Supplier 1=DigiKey, Turn-Off Delay Time=25ns, Turn-On Delay Time=3ns
D8: library part "MOSFET P-CH 20V 4A SOT23-3", "P-ch Mosfet 20V 4A 39MΩ@4A, 4.5V 9.1NC@4.5V 294PF@10V SOT-23-3 SMD 2.9MM × 1.3MM × 1.03MM", Case/Package=SOT-23, Continuous Drain Current (ID)=4A, Drain to Source Breakdown Voltage=-20V, Drain to Source Resistance=42.5mΩ, Gate to Source Voltage (Vgs)=8V, Input Capacitance=294pF, Manufacturer="Diodes Inc.", Manufacturer Part Number=DMG3415U-7, Max Junction Temperature (Tj)=150°C, Max Power Dissipation=900mW, Min Breakdown Voltage=20V, Min Operating Temperature=-55°C, Supplier Part Number 1=DMG3415UDIDKR-ND, Threshold Voltage=-550mV, Category=MOSFETs, China RoHS=Compliant, ComponentLink1Description=https://datasheet.octopart.com:443/DMG3415U-7-Diodes-Inc.-datasheet-180552899.pdf?src-supplier=IHS, ComponentLink1URL=https://datasheet.octopart.com:443/DMG3415U-7-Diodes-Inc.-datasheet-180552899.pdf?src-supplier=IHS, ComponentLink2Description=https://datasheet.octopart.com:443/DMG3415U-7-Diodes-Inc.-datasheet-41567333.pdf?src-supplier=Newark, ComponentLink2URL=https://datasheet.octopart.com:443/DMG3415U-7-Diodes-Inc.-datasheet-41567333.pdf?src-supplier=Newark, ComponentLink3Description=https://datasheet.octopart.com:443/DMG3415U-7-Diodes-Inc.-datasheet-12530588.pdf?src-supplier=Newark, ComponentLink3URL=https://datasheet.octopart.com:443/DMG3415U-7-Diodes-Inc.-datasheet-12530588.pdf?src-supplier=Newark, ComponentLink4Description=https://datasheet.octopart.com:443/DMG3415U-7-Diodes-Inc.-datasheet-10027536.pdf?src-supplier=Newark, ComponentLink4URL=https://datasheet.octopart.com:443/DMG3415U-7-Diodes-Inc.-datasheet-10027536.pdf?src-supplier=Newark, ComponentLink5Description=https://sigma.octopart.com:443/138706058/technical_drawing/Diodes-Inc.-DMG3415U-7.pdf?src-supplier=Upverter, ComponentLink5URL=https://sigma.octopart.com:443/138706058/technical_drawing/Diodes-Inc.-DMG3415U-7.pdf?src-supplier=Upverter, ComponentLink6Description=https://datasheet.octopart.com:443/DMG3415U-7-Diodes-Inc.-datasheet-14060167.pdf?src-supplier=iiiC, ComponentLink6URL=https://datasheet.octopart.com:443/DMG3415U-7-Diodes-Inc.-datasheet-14060167.pdf?src-supplier=iiiC, ComponentLink7Description=https://datasheet.octopart.com:443/DMG3415U-7-Diodes-Inc.-datasheet-11766085.pdf?src-supplier=Future+Electronics, ComponentLink7URL=https://datasheet.octopart.com:443/DMG3415U-7-Diodes-Inc.-datasheet-11766085.pdf?src-supplier=Future+Electronics, ComponentLink8Description=http://sigma.octopart.com:80/15540767/rohs_statement/Diodes-Inc.-DMG3415U-7.pdf?src-supplier=Compliance+Statements, ComponentLink8URL=http://sigma.octopart.com:80/15540767/rohs_statement/Diodes-Inc.-DMG3415U-7.pdf?src-supplier=Compliance+Statements, Contact Plating=Tin, Drain to Source Voltage (Vdss)=-20V, Element Configuration=Single, Fall time=393ns, Height=1.1mm, Lead Free="Lead Free", Length=2.9mm, LIB MADE BY="MR HOANG", Lifecycle Status=NRND, Link=https://linhkien.cxtvn.com/2362-dmg3415-mosfet-p-ch-20v-4a-sot23-3-5c.html, Max Operating Temperature=150°C, Mount="Surface Mount", Nominal Vgs=-550mV, Number of Channels=1, Number of Elements=1, Number of Pins=3, Number of Terminals=3, Packaging="Cut Tape", Power Dissipation=900mW, Pricing 1="1=0.52, 10=0.318, 25=0.264, 50=0.23, 100=0.2012 (USD)", Radiation Hardening=No, Rds On Max=39mΩ, REACH SVHC=Yes, Resistance=42.5mΩ, Rise time=117ns, RoHS=Compliant, Schedule B="8541210080, 8541210080|8541210080|8541210080|8541210080|8541210080|8541210080|8541210080|8541210080|8541210080|8541210080|8541210080|8541210080|8541210080|8541210080|8541210080|8541210080|8541210080|8541210080|8541210080|8541210080|8541210080|8541210080|8541210080|85", Stock 1=74827, Supplier 1=DigiKey, Turn-Off Delay Time=795ns, Turn-On Delay Time=71ns, Weight=7.994566mg, Width=1.3mm
D9: library part "DIODE ZENER 5.1V 500MW SOD123F", "BZT52C5V1 Series 500 mW 5.1 V 10 mA Surface Mount Zener Diode - SOD-123", Current=1A, Forward Current=10mA, Forward Voltage=900mV, Manufacturer="Diodes Inc.", Manufacturer Part Number=BZT52C5V1-7-F, Max Junction Temperature (Tj)=150°C, Max Power Dissipation=370mW, Max Reverse Leakage Current=2µA, Min Operating Temperature=-65°C, Output Current=50mA, Power Rating=500mW, Reference Voltage=5.1V, Reverse Standoff Voltage=2V, Supplier Part Number 1=BZT52C5V1-FDICT-ND, Test Current=5mA, Tolerance=6%, Voltage Tolerance=5.88%, Category="Zener Diodes", China RoHS=Compliant, ComponentLink1Description=https://datasheet.octopart.com:443/BZT52C5V1-7-F-Diodes-Inc.-datasheet-101585693.pdf?src-supplier=IHS, ComponentLink1URL=https://datasheet.octopart.com:443/BZT52C5V1-7-F-Diodes-Inc.-datasheet-101585693.pdf?src-supplier=IHS, ComponentLink2Description=https://sigma.octopart.com:443/138895985/technical_drawing/Diodes-Inc.-BZT52C5V1-7-F.pdf?src-supplier=Diodes+Inc+SCT, ComponentLink2URL=https://sigma.octopart.com:443/138895985/technical_drawing/Diodes-Inc.-BZT52C5V1-7-F.pdf?src-supplier=Diodes+Inc+SCT, ComponentLink3Description=https://datasheet.octopart.com:443/BZT52C5V1-7-F-Diodes-Inc.-datasheet-12513818.pdf?src-supplier=Newark, ComponentLink3URL=https://datasheet.octopart.com:443/BZT52C5V1-7-F-Diodes-Inc.-datasheet-12513818.pdf?src-supplier=Newark, ComponentLink4Description=https://datasheet.octopart.com:443/BZT52C5V1-7-F-Diodes-Inc.-datasheet-10839781.pdf?src-supplier=element14+APAC, ComponentLink4URL=https://datasheet.octopart.com:443/BZT52C5V1-7-F-Diodes-Inc.-datasheet-10839781.pdf?src-supplier=element14+APAC, ComponentLink5Description=https://datasheet.octopart.com:443/BZT52C5V1-7-F-Diodes-Inc.-datasheet-10941054.pdf?src-supplier=element14+APAC, ComponentLink5URL=https://datasheet.octopart.com:443/BZT52C5V1-7-F-Diodes-Inc.-datasheet-10941054.pdf?src-supplier=element14+APAC, ComponentLink6Description=https://datasheet.octopart.com:443/BZT52C5V1-7-F-Diodes-Inc.-datasheet-10405015.pdf?src-supplier=element14+APAC, ComponentLink6URL=https://datasheet.octopart.com:443/BZT52C5V1-7-F-Diodes-Inc.-datasheet-10405015.pdf?src-supplier=element14+APAC, ComponentLink7Description=https://datasheet.octopart.com:443/BZT52C5V1-7-F-Diodes-Inc.-datasheet-5318325.pdf?src-supplier=element14+APAC, ComponentLink7URL=https://datasheet.octopart.com:443/BZT52C5V1-7-F-Diodes-Inc.-datasheet-5318325.pdf?src-supplier=element14+APAC, ComponentLink8Description=https://datasheet.octopart.com:443/BZT52C5V1-7-F-Diodes-Inc.-datasheet-14050928.pdf?src-supplier=iiiC, ComponentLink8URL=https://datasheet.octopart.com:443/BZT52C5V1-7-F-Diodes-Inc.-datasheet-14050928.pdf?src-supplier=iiiC, ComponentLink9Description=https://datasheet.octopart.com:443/BZT52C5V1-7-F-Diodes-Inc.-datasheet-7278440.pdf?src-supplier=Jameco+(USA), ComponentLink9URL=https://datasheet.octopart.com:443/BZT52C5V1-7-F-Diodes-Inc.-datasheet-7278440.pdf?src-supplier=Jameco+(USA), ComponentLink10Description=https://datasheet.octopart.com:443/BZT52C5V1-7-F-Diodes-Inc.-datasheet-1309.pdf?src-supplier=Mouser, ComponentLink10URL=https://datasheet.octopart.com:443/BZT52C5V1-7-F-Diodes-Inc.-datasheet-1309.pdf?src-supplier=Mouser, ComponentLink11Description=https://datasheet.octopart.com:443/BZT52C5V1-7-F-Diodes-Inc.-datasheet-593.pdf?src-supplier=DigiKey, ComponentLink11URL=https://datasheet.octopart.com:443/BZT52C5V1-7-F-Diodes-Inc.-datasheet-593.pdf?src-supplier=DigiKey, ComponentLink12Description=http://sigma.octopart.com:80/15616906/materials_sheet/Diodes-Inc.-BZT52C5V1-7-F.pdf?src-supplier=Compliance+Statements, ComponentLink12URL=http://sigma.octopart.com:80/15616906/materials_sheet/Diodes-Inc.-BZT52C5V1-7-F.pdf?src-supplier=Compliance+Statements, ComponentLink13Description="New link", Composition=Zener, Country of Origin="Mainland China, Taiwan", Element Configuration=Single, Export Control Classification Number (ECCN) Code=EAR99, Harmonized Tariff Schedule (HTS) Code=8541.10.00.50, Height=1.45mm, Impedance=60Ω, Introduction Date=2002-09-04, Lead Free="Lead Free", Length=2.85mm, LIB MADE BY="MR HOANG", Lifecycle Status=Production, Link=https://linhkien.cxtvn.com/2446-bzt52c5v1-diode-zener-51v-500mw-sod123-10c.html, Max Operating Temperature=150°C, Mount="Surface Mount", Number of Elements=1, Number of Pins=2, Number of Terminals=2, Packaging="Cut Tape", Peak Reverse Current=2µA, Polarity=Unidirectional, Power Dissipation=370mW, Pricing 1="1=0.21, 10=0.128, 25=0.1052, 50=0.091, 100=0.079 (USD)", Radiation Hardening=No, REACH SVHC=Yes, RoHS=Compliant, Schedule B="8541100050, 8541100050|8541100050|8541100050|8541100050|8541100050|8541100050|8541100050|8541100050|8541100050|8541100050|8541100050|8541100050|8541100050|8541100050|8541100050|8541100050|8541100050|8541100050|8541100050|8541100050|8541100050|8541100050|8541100050|85", Supplier 1=DigiKey, Termination=SMD/SMT, Voltage Rating (DC)=5.1V, Weight=10.007382mg, Width=1.7mm, Working Voltage=5.1V, Zener Current=5mA, Zener Voltage=5.1V
D10 D11 D16 D17 LED4 LED5 LED6: library part "LED GREEN CLEAR CHIP SMD", "Single-color LEDs; LITEON; LTST-C190GKT; Green; 130 °; 2.1 V; 0603", Case Code (Imperial)=0603, Case Code (Metric)=1608, Color=Green, Current=1A, Forward Current=30mA, Forward Voltage=2.6V, Lens Color="Clear, Colorless", Manufacturer="Diodes Inc.", Manufacturer Part Number=LTST-C190GKT, Max Operating Temperature=85°C, Min Operating Temperature=-55°C, Power Dissipation=100mW, Reverse Voltage=5V, Supplier Part Number=160-LTST-C190GKTDKR-ND, Test Current=10mA, Voltage=2V, Case/Package=0603, Category=LEDs, China RoHS=Compliant, ComponentLink1Description=https://datasheet.octopart.com:443/LTST-C190GKT-Lite-On-datasheet-66499085.pdf?src-supplier=IHS, ComponentLink1URL=https://datasheet.octopart.com:443/LTST-C190GKT-Lite-On-datasheet-66499085.pdf?src-supplier=IHS, ComponentLink2Description=https://datasheet.octopart.com:443/LTST-C190GKT-Lite-On-datasheet-158530.pdf?src-supplier=Electro+Sonic, ComponentLink2URL=https://datasheet.octopart.com:443/LTST-C190GKT-Lite-On-datasheet-158530.pdf?src-supplier=Electro+Sonic, ComponentLink3Description=https://datasheet.octopart.com:443/LTST-C190GKT-Lite-On-datasheet-87079182.pdf?src-supplier=Upverter, ComponentLink3URL=https://datasheet.octopart.com:443/LTST-C190GKT-Lite-On-datasheet-87079182.pdf?src-supplier=Upverter, ComponentLink4Description=https://datasheet.octopart.com:443/LTST-C190GKT-Lite-On-datasheet-7279162.pdf?src-supplier=Future+Electronics, ComponentLink4URL=https://datasheet.octopart.com:443/LTST-C190GKT-Lite-On-datasheet-7279162.pdf?src-supplier=Future+Electronics, ComponentLink5Description=https://datasheet.octopart.com:443/LTST-C190GKT-Lite-On-datasheet-86397319.pdf?src-supplier=Future+Electronics, ComponentLink5URL=https://datasheet.octopart.com:443/LTST-C190GKT-Lite-On-datasheet-86397319.pdf?src-supplier=Future+Electronics, ComponentLink6Description=https://datasheet.octopart.com:443/LTST-C190GKT-Lite-On-datasheet-93383.pdf?src-supplier=DigiKey, ComponentLink6URL=https://datasheet.octopart.com:443/LTST-C190GKT-Lite-On-datasheet-93383.pdf?src-supplier=DigiKey, ComponentLink7Description=https://datasheet.octopart.com:443/LTST-C190GKT-Lite-On-datasheet-14174996.pdf?src-supplier=iiiC, ComponentLink7URL=https://datasheet.octopart.com:443/LTST-C190GKT-Lite-On-datasheet-14174996.pdf?src-supplier=iiiC, ComponentLink8Description=https://datasheet.octopart.com:443/LTST-C190GKT-Lite-On-datasheet-62340971.pdf?src-supplier=TME, ComponentLink8URL=https://datasheet.octopart.com:443/LTST-C190GKT-Lite-On-datasheet-62340971.pdf?src-supplier=TME, Contact Plating=Tin, Country of Origin="Mainland China", Depth=800µm, Dominant Wavelength=569nm, Export Control Classification Number (ECCN) Code=EAR99, Harmonized Tariff Schedule (HTS) Code=8541.40.20.00, Height=800µm, Illumination Color=Green, Introduction Date=1997-12-01, Lead Free="Lead Free", Length=1.6mm, Lens Style=Clear, Lens Transparency=Clear, LIB MADE BY="MR HOANG", Lifecycle Status=NRND, Link=https://www.thegioiic.com/led-xanh-la-0603-dan-smd-trong-suot, Luminous Intensity=1.8mcd, Mounting Technology="Surface Mount", Number of Circuits=1, Number of Elements=1, Number of LEDs=1, Number of Terminals=2, Peak Wavelength=565nm, Pins=2, Power Rating=100mW, Pricing="1=0.14, 10=0.096, 100=0.0662, 500=0.05232, 1000=0.0477, 2000=0.04374 (USD)", Radiation Hardening=No, REACH SVHC=Yes, RoHS=Compliant, Schedule B="8541402000, 8541402000|8541402000|8541402000|8541402000|8541402000", Shape=Rectangular, Stock=1226903, Supplier=DigiKey, Terminal Pitch=1.5mm, Viewing Angle=130°, Wavelength=569nm, Width=800µm